# Altium PCB Three_Phase_Rectifier_Regulator.PcbDoc
Units mil, origin at the board's own origin, x right, y up, seen from the top; angles counter-clockwise.
Board outline 3937.01 x 3937.01 mil, 2 copper layers (Top Layer, Bottom Layer); 16 components, 9 nets, 757 pads, 0 vias.
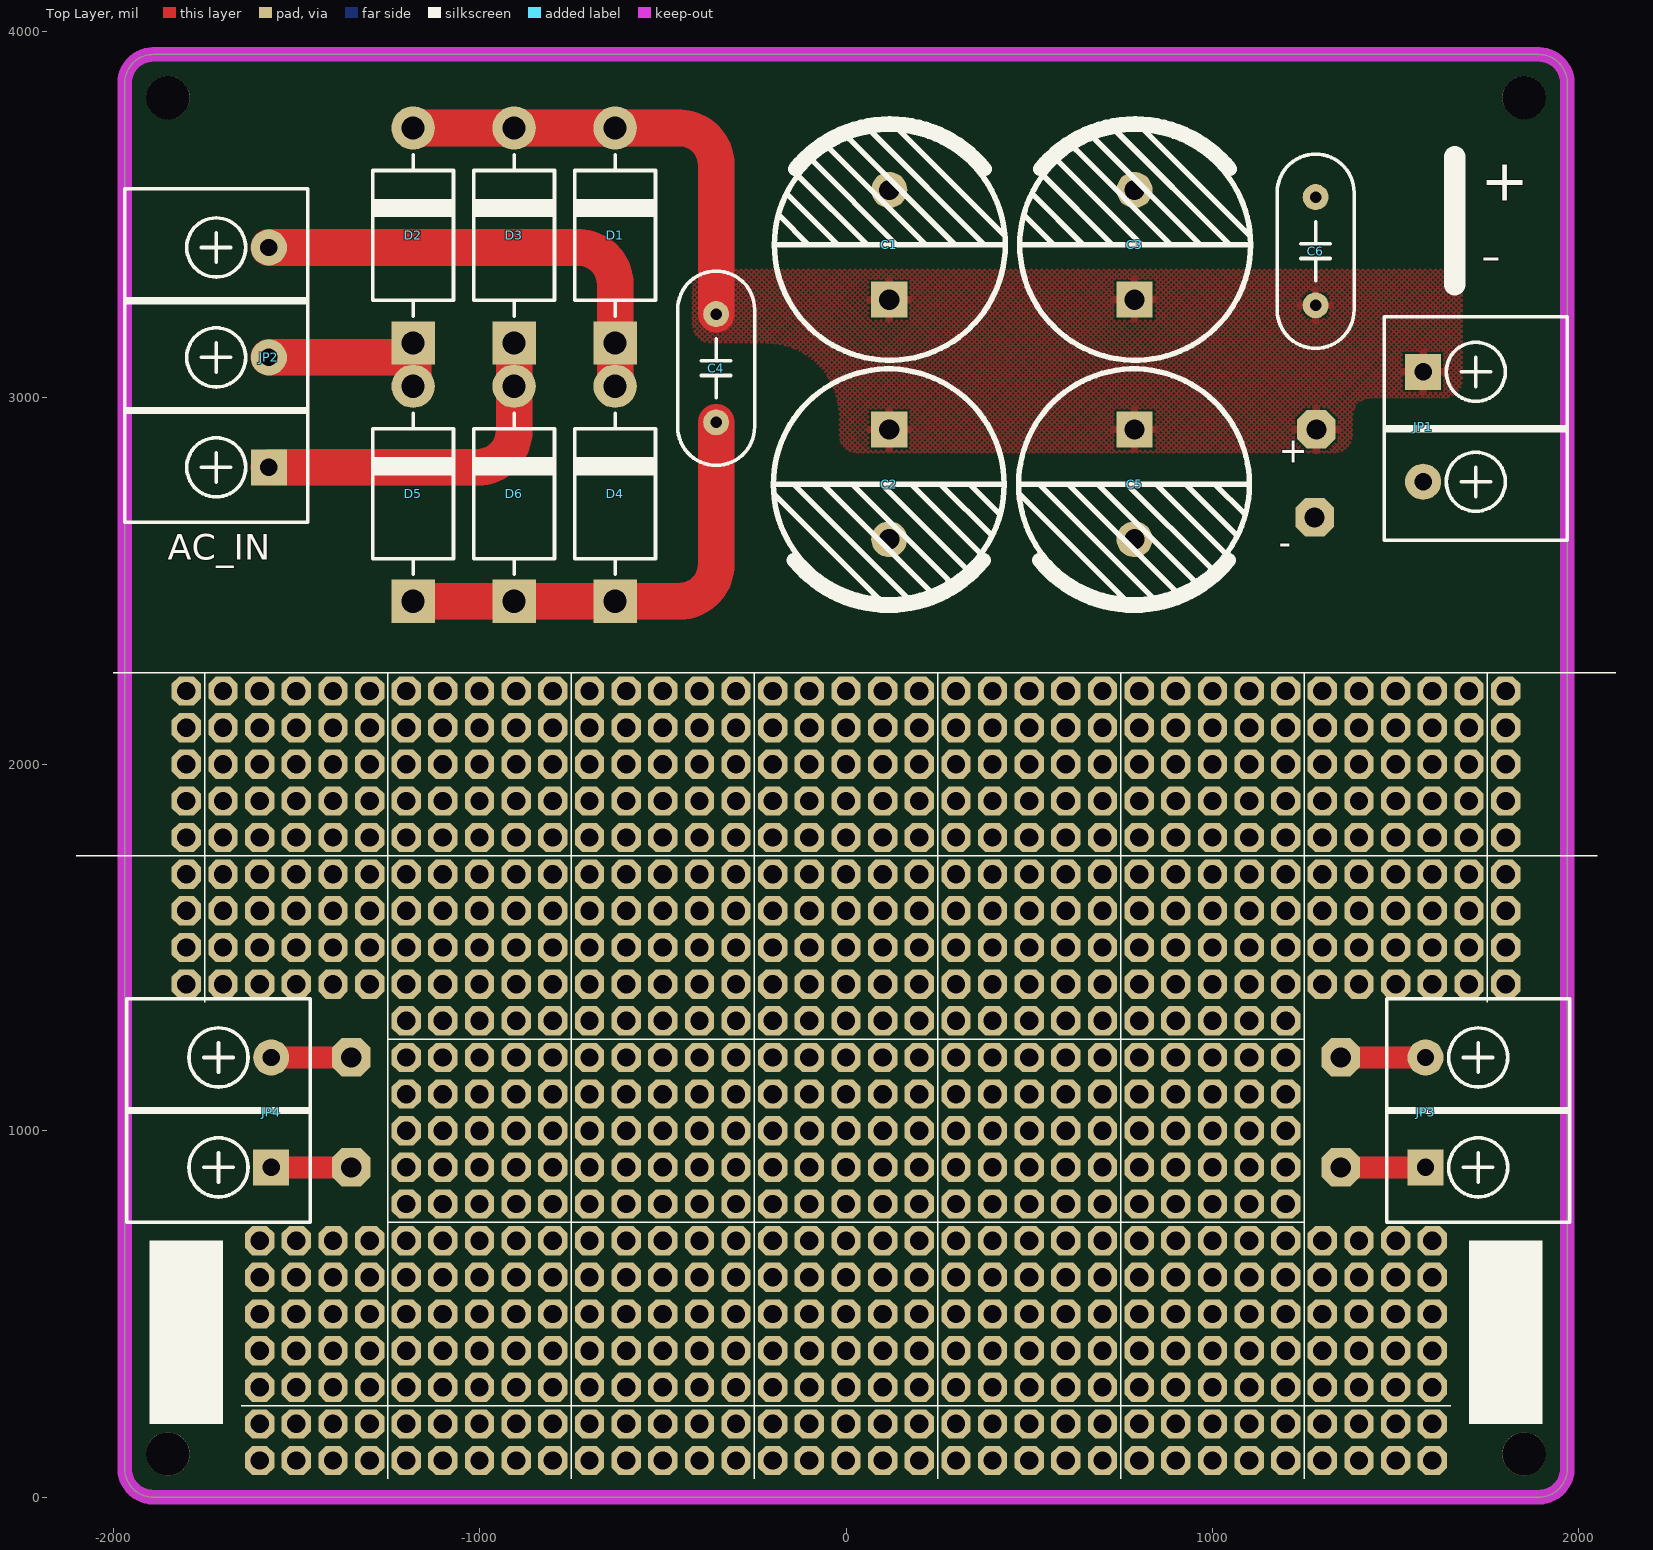
[diagram p0: Top Layer view]
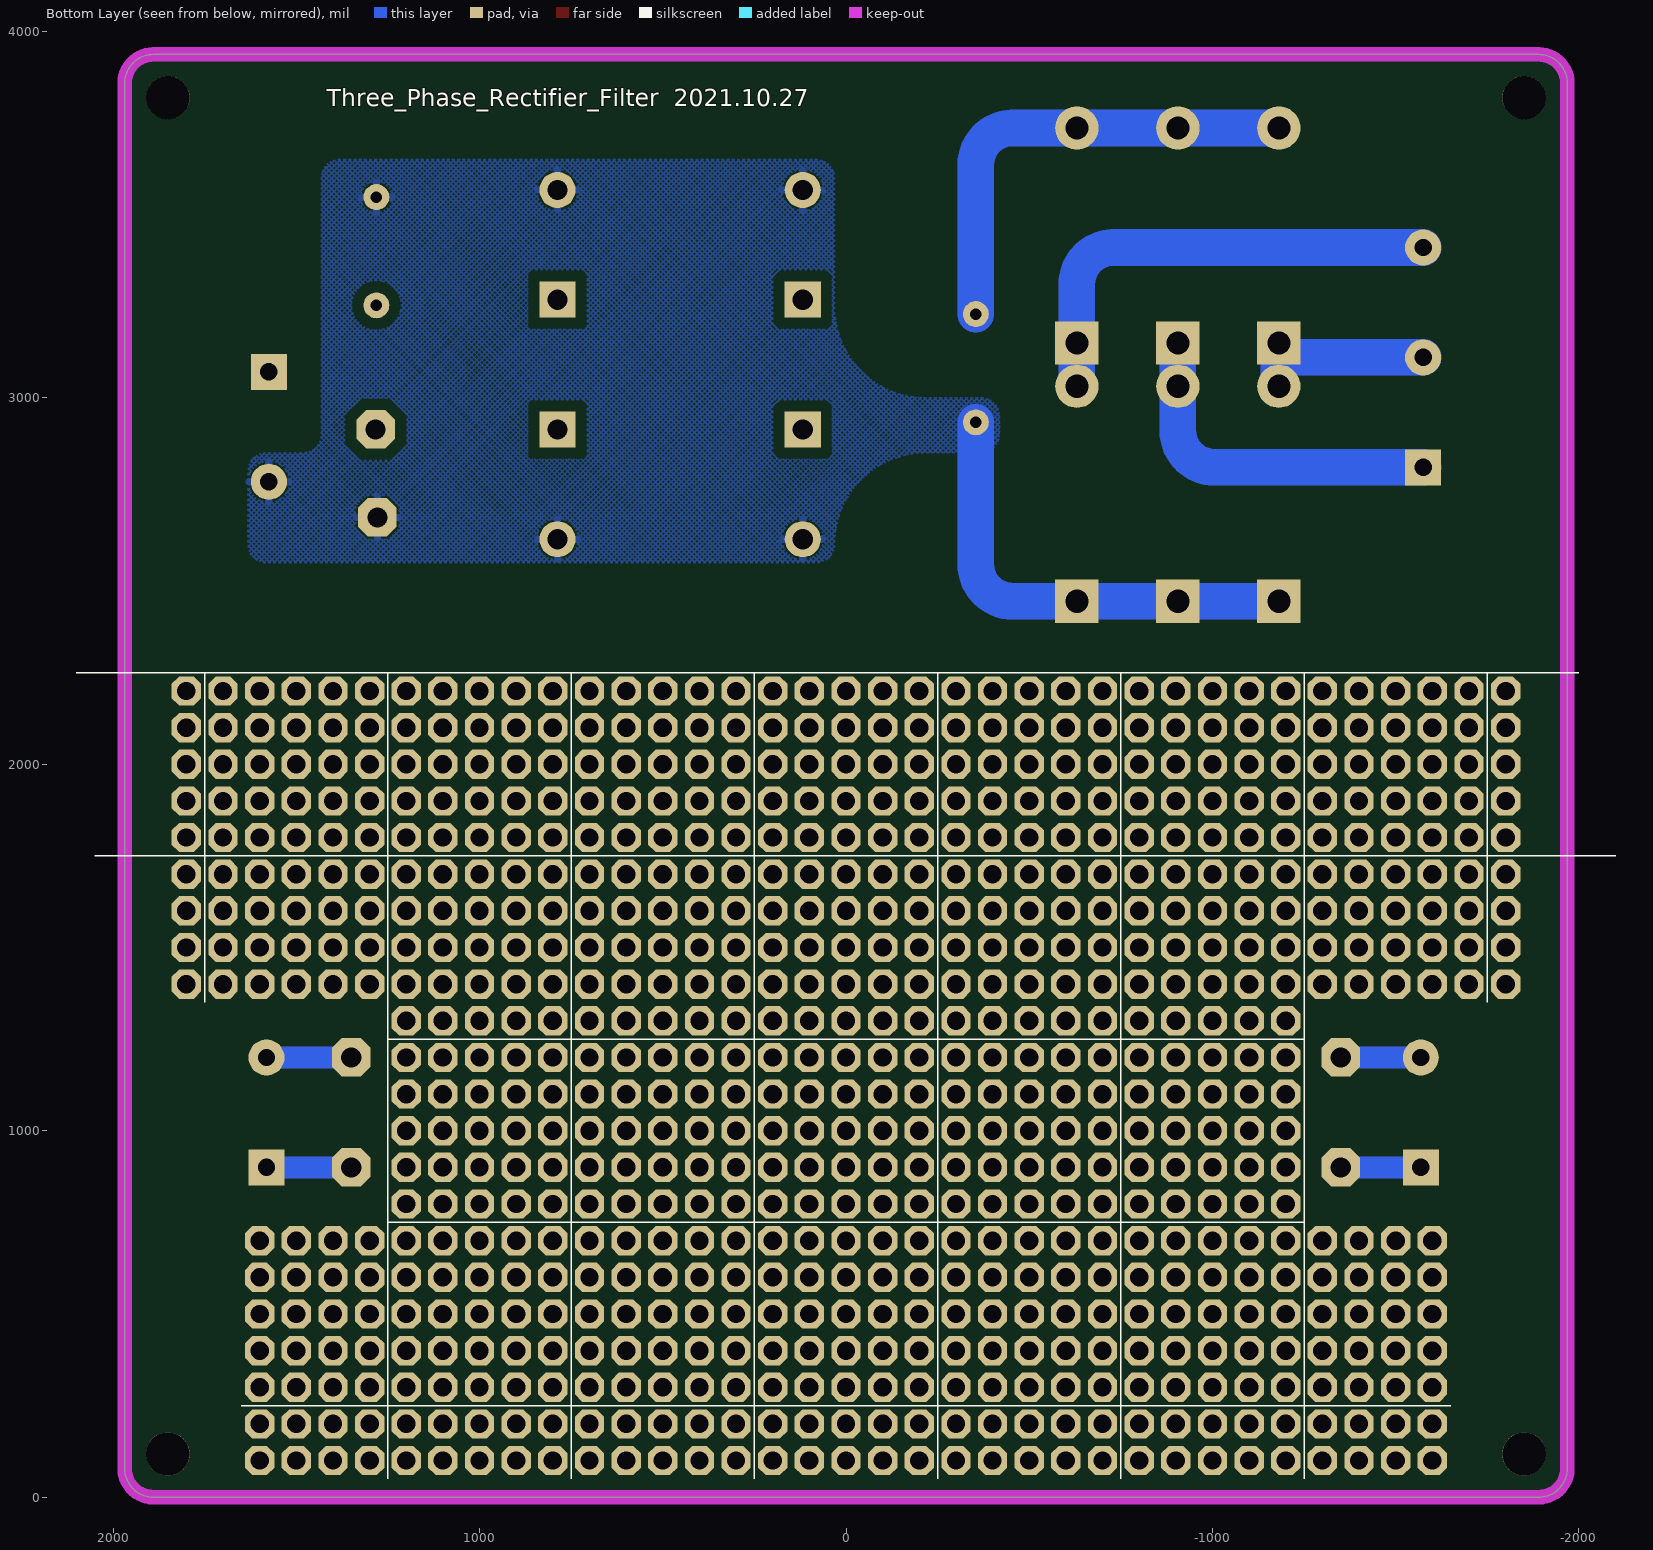
[diagram p1: Bottom Layer view, seen from below]

## Layer stack, top to bottom
Top Solder: solder mask 0.4, Solder Resist, Dk 3.5
Top Layer: signal copper 1.4
Dielectric 1: dielectric 12.6, FR-4, Dk 4.8
Bottom Layer: signal copper 1.4
Bottom Solder: solder mask 0.4, Solder Resist, Dk 3.5

## Board outline
-1968.5,78.74 -1968.5,3858.27 cw(c-1889.76,3858.27) -1889.76,3937.01 1889.76,3937.01 cw(c1889.76,3858.27) 1968.5,3858.27 1968.5,78.74 cw(c1889.76,78.74) 1889.76,0 -1889.76,0 cw(c-1889.76,78.74)

## Design rules (kind name [scope] priority, off if disabled: settings)
Clearance [All] p1: gap=30 ignorepadtopadclearanceinfootprint=FALSE except(0: Arc-Hole Track-Hole SMDPad-Hole THPad-Hole Via-Hole Fill-Hole Poly-Hole Region-Hole Text-Hole; 10: Arc-Arc Arc-Track Arc-SMDPad Arc-THPad Arc-Via Arc-Text Track-Track Track-SMDPad Track-THPad Track-Via Track-Text SMDPad-SMDPad SMDPad-THPad SMDPad-Via SMDPad-Text THPad-THPad THPad-Via THPad-Text Via-Via Via-Text Text-Text)
HoleSize [All] p1 off: absolutevalues=TRUE maxlimit=100 minlimit=1 maxpercent=80.000 minpercent=20.000
MinimumSolderMaskSliver [All] p1 off: minsoldermaskwidth=10
PolygonConnect [All] p1: thpad.connectstyle=Relief thpad.reliefconductorwidth=20 thpad.reliefentries=4 thpad.polygonreliefangle="90 Angle" thpad.airgapwidth=5 smdpad.connectstyle=Relief smdpad.reliefconductorwidth=10 smdpad.reliefentries=4 smdpad.polygonreliefangle="90 Angle" smdpad.airgapwidth=10 via.connectstyle=Relief via.reliefconductorwidth=10 via.reliefentries=4 via.polygonreliefangle="90 Angle" via.airgapwidth=10
RoutingVias [All] p1: holewidth=28 width=50 viastyle="Through Hole" minholewidth=28 minwidth=50 maxholewidth=28 maxwidth=50
SilkToSilkClearance [All] p1 off: silktosilkclearance=10
SilkToSolderMaskClearance [IsPad] p1 off: minsilkscreentomaskgap=10 clearancetoexposedcopper=TRUE
SolderMaskExpansion [All] p1: expansion=4 istentingtop=FALSE
Width [All] p1: maxlimit=100 minlimit=10 preferedwidth=10
26 further rules are at their usual default settings.

## Components (designator, comment, footprint, x,y, rotation, side; value= is the part's Value field where it differs from the comment)
C1 "400uF" "CAP 7.5*16*25 - GD" 119.61,3417.32 r90 top
C2 "400uF" "CAP 7.5*16*25 - GD" 116.61,2763.78 r270 top
C3 "400uF" "CAP 7.5*16*25 - GD" 788.9,3417.32 r90 top
C4 "47nF/1KV" "CY 7.5*12*5" -354.33,3080.71 r90 top
C5 "400uF" "CAP 7.5*16*25 - GD" 785.9,2763.78 r270 top
C6 "47nF/1KV" "CY 7.5*12*5" 1281.5,3400 r270 top
D1 "SR540" DO-27 -629.92,3442.91 r90 top
D2 "SR540" DO-27 -1181.1,3442.91 r90 top
D3 "SR540" DO-27 -905.51,3442.91 r90 top
D4 "SR540" DO-27 -629.92,2738.19 r90 top
D5 "SR540" DO-27 -1181.1,2738.19 r90 top
D6 "SR540" DO-27 -905.51,2738.19 r90 top
JP1 "HDR-1X2" KF7620-2P#1 1718.5,2920.87 r270 top
JP2 "HDR-1X3" KF7620-3P -1718.5,3110.24 r90 top
JP3 "HDR-1X2" KF7620-2P#2 1725.2,1050 r90 top
JP4 "HDR-1X2" KF7620-2P#1 -1712.2,1050 r90 top

## Footprints (in the part's own frame and the unit in brackets; to place one, negate y for a bottom-side part, rotate by r counter-clockwise, add the part's x,y. Pads: shape width x height; smd on the part's side, far side on the other; paste and mask are expansions set on the pad)
"CAP 7.5*16*25 - GD" [mm] "脚距7.5mm直径16mm高度25mmhttps://item.taobao.com/item.htm?ft=t&id=613637044352"
  rect 2.5x2.5 hole 1.4: 1(-3.8,0.038)
  round 2.5 hole 1.4: 2(3.8,0.038)
  silkscreen extent -8,-8 8.42,8, body extent -8,-8 8.01,8, height 25.04
"CY 7.5*12*5" [mm] "脚距7.5mm，直径12mm，厚5mmhttps://item.taobao.com/item.htm?ft=t&id=613637044352"
  round 1.8 hole 0.8: 1(-3.75,0) 2(3.75,0)
  silkscreen extent -6.73,-2.67 6.73,2.67, body extent -6,-2.5 6,2.5, height 12.2
DO-27 [mm] "5.2*14.9mm(直径，脚距）淘宝ID:小糖豆的小窝窝"
  rect 3x3 hole 1.6: 1(-7.45,0)
  round 3 hole 1.6: 2(7.45,0)
  silkscreen extent -5.59,-2.79 5.59,2.79, body extent -8.1,-2.6 8.1,2.6, height 5.25
KF7620-2P#1 [mm] "15.2*12*12mm(长宽高)"
  rect 2.5x2.5 hole 1.2: 1(-3.81,-3.65)
  round 2.5 hole 1.2: 2(3.81,-3.65)
  silkscreen extent -7.62,-6.35 7.87,6.35, body extent -7.62,-6.2 8.32,6.2, height 12.45
KF7620-2P#2 [mm] "15.2*12*12mm(长宽高)"
  rect 2.5x2.5 hole 1.2: 1(-3.81,3.65)
  round 2.5 hole 1.2: 2(3.81,3.65)
  silkscreen extent -7.62,-6.35 7.87,6.35, body extent -7.62,-6.2 8.32,6.2, height 12.45
KF7620-3P [mm] "22.8*12*12mm(长宽高)"
  rect 2.5x2.5 hole 1.2: 1(-7.62,-3.65)
  round 2.5 hole 1.2: 2(0,-3.65) 3(7.62,-3.65)
  silkscreen extent -11.43,-6.35 11.68,6.35, body extent -11.43,-6.2 12.13,6.2, height 12.45

## Part data
C1 C2 C3 C5: library part CE, "直插电解电容", BOM名称=直插电解电容, 下单链接=https://item.taobao.com/item.htm?ft=t&id=613637044352, 淘宝ID=小糖豆的小窝窝
C4 C6: library part CY, "安规Y电容", BOM名称=安规Y电容, 下单链接=https://item.taobao.com/item.htm?ft=t&id=613637044352, 淘宝ID=小糖豆的小窝窝
D1 D2 D3 D4 D5 D6: "肖特基二极管", BOM名称=肖特基二极管, 下单链接=https://item.taobao.com/item.htm?ft=t&id=613637044352
JP1 JP3 JP4: library part "Header 2", "2P接插件", BOM名称=2P接插件, 下单链接=https://item.taobao.com/item.htm?ft=t&id=613637044352, 淘宝ID=小糖豆的小窝窝
JP2: library part "Header 3", "3P接插件", BOM名称=3P接插件, 下单链接=https://item.taobao.com/item.htm?ft=t&id=613637044352, 淘宝ID=小糖豆的小窝窝

## Free pads (board coordinates)
  round 118.11 hole 118.11: Q(-1850.39,118.11) Q(-1850.39,3818.9) Q(1850.39,118.11) Q(1850.39,3818.9)
  oct 80x80 hole 50: Q(-1800,1400) Q(-1800,1500) Q(-1800,1600) Q(-1800,1700) Q(-1800,1800) Q(-1800,1900) Q(-1800,2000) Q(-1800,2100) Q(-1800,2200) Q(-1700,1400) Q(-1700,1500) Q(-1700,1600) Q(-1700,1700) Q(-1700,1800) Q(-1700,1900) Q(-1700,2000) Q(-1700,2100) Q(-1700,2200) Q(-1600,100) Q(-1600,200) Q(-1600,300) Q(-1600,400) Q(-1600,500) Q(-1600,600) Q(-1600,700) Q(-1600,1400) Q(-1600,1500) Q(-1600,1600) Q(-1600,1700) Q(-1600,1800) Q(-1600,1900) Q(-1600,2000) Q(-1600,2100) Q(-1600,2200) Q(-1500,100) Q(-1500,200) Q(-1500,300) Q(-1500,400) Q(-1500,500) Q(-1500,600) Q(-1500,700) Q(-1500,1400) Q(-1500,1500) Q(-1500,1600) Q(-1500,1700) Q(-1500,1800) Q(-1500,1900) Q(-1500,2000) Q(-1500,2100) Q(-1500,2200) Q(-1400,100) Q(-1400,200) Q(-1400,300) Q(-1400,400) Q(-1400,500) Q(-1400,600) Q(-1400,700) Q(-1400,1400) Q(-1400,1500) Q(-1400,1600) Q(-1400,1700) Q(-1400,1800) Q(-1400,1900) Q(-1400,2000) Q(-1400,2100) Q(-1400,2200) Q(-1300,100) Q(-1300,200) Q(-1300,300) Q(-1300,400) Q(-1300,500) Q(-1300,600) Q(-1300,700) Q(-1300,1400) Q(-1300,1500) Q(-1300,1600) Q(-1300,1700) Q(-1300,1800) Q(-1300,1900) Q(-1300,2000) Q(-1300,2100) Q(-1300,2200) Q(-1200,100) Q(-1200,200) Q(-1200,300) Q(-1200,400) Q(-1200,500) Q(-1200,600) Q(-1200,700) Q(-1200,800) Q(-1200,900) Q(-1200,1000) Q(-1200,1100) Q(-1200,1200) Q(-1200,1300) Q(-1200,1400) Q(-1200,1500) Q(-1200,1600) Q(-1200,1700) Q(-1200,1800) Q(-1200,1900) Q(-1200,2000) Q(-1200,2100) Q(-1200,2200) Q(-1100,100) Q(-1100,200) Q(-1100,300) Q(-1100,400) Q(-1100,500) Q(-1100,600) Q(-1100,700) Q(-1100,800) Q(-1100,900) Q(-1100,1000) Q(-1100,1100) Q(-1100,1200) Q(-1100,1300) Q(-1100,1400) Q(-1100,1500) Q(-1100,1600) Q(-1100,1700) Q(-1100,1800) Q(-1100,1900) Q(-1100,2000) Q(-1100,2100) Q(-1100,2200) Q(-1000,100) Q(-1000,200) Q(-1000,300) Q(-1000,400) Q(-1000,500) Q(-1000,600) Q(-1000,700) Q(-1000,800) Q(-1000,900) Q(-1000,1000) Q(-1000,1100) Q(-1000,1200) Q(-1000,1300) Q(-1000,1400) Q(-1000,1500) Q(-1000,1600) Q(-1000,1700) Q(-1000,1800) Q(-1000,1900) Q(-1000,2000) Q(-1000,2100) Q(-1000,2200) Q(-900,100) Q(-900,200) Q(-900,300) Q(-900,400) Q(-900,500) Q(-900,600) Q(-900,700) Q(-900,800) Q(-900,900) Q(-900,1000) Q(-900,1100) Q(-900,1200) Q(-900,1300) Q(-900,1400) Q(-900,1500) Q(-900,1600) Q(-900,1700) Q(-900,1800) Q(-900,1900) Q(-900,2000) Q(-900,2100) Q(-900,2200) Q(-800,100) Q(-800,200) Q(-800,300) Q(-800,400) Q(-800,500) Q(-800,600) Q(-800,700) Q(-800,800) Q(-800,900) Q(-800,1000) Q(-800,1100) Q(-800,1200) Q(-800,1300) Q(-800,1400) Q(-800,1500) Q(-800,1600) Q(-800,1700) Q(-800,1800) Q(-800,1900) Q(-800,2000) Q(-800,2100) Q(-800,2200) Q(-700,100) Q(-700,200) Q(-700,300) Q(-700,400) Q(-700,500) Q(-700,600) Q(-700,700) Q(-700,800) Q(-700,900) Q(-700,1000) Q(-700,1100) Q(-700,1200) Q(-700,1300) Q(-700,1400) Q(-700,1500) Q(-700,1600) Q(-700,1700) Q(-700,1800) Q(-700,1900) Q(-700,2000) Q(-700,2100) Q(-700,2200) Q(-600,100) Q(-600,200) Q(-600,300) Q(-600,400) Q(-600,500) Q(-600,600) Q(-600,700) Q(-600,800) Q(-600,900) Q(-600,1000) Q(-600,1100) Q(-600,1200) Q(-600,1300) Q(-600,1400) Q(-600,1500) Q(-600,1600) Q(-600,1700) Q(-600,1800) Q(-600,1900) Q(-600,2000) Q(-600,2100) Q(-600,2200) Q(-500,100) Q(-500,200) Q(-500,300) Q(-500,400) Q(-500,500) Q(-500,600) Q(-500,700) Q(-500,800) Q(-500,900) Q(-500,1000) Q(-500,1100) Q(-500,1200) Q(-500,1300) Q(-500,1400) Q(-500,1500) Q(-500,1600) Q(-500,1700) Q(-500,1800) Q(-500,1900) Q(-500,2000) Q(-500,2100) Q(-500,2200) Q(-400,100) Q(-400,200) Q(-400,300) Q(-400,400) Q(-400,500) Q(-400,600) Q(-400,700) Q(-400,800) Q(-400,900) Q(-400,1000) Q(-400,1100) Q(-400,1200) Q(-400,1300) Q(-400,1400) Q(-400,1500) Q(-400,1600) Q(-400,1700) Q(-400,1800) Q(-400,1900) Q(-400,2000) Q(-400,2100) Q(-400,2200) Q(-300,100) Q(-300,200) Q(-300,300) Q(-300,400) Q(-300,500) Q(-300,600) Q(-300,700) Q(-300,800) Q(-300,900) Q(-300,1000) Q(-300,1100) Q(-300,1200) Q(-300,1300) Q(-300,1400) Q(-300,1500) Q(-300,1600) Q(-300,1700) Q(-300,1800) Q(-300,1900) Q(-300,2000) Q(-300,2100) Q(-300,2200) Q(-200,100) Q(-200,200) Q(-200,300) Q(-200,400) Q(-200,500) Q(-200,600) Q(-200,700) Q(-200,800) Q(-200,900) Q(-200,1000) Q(-200,1100) Q(-200,1200) Q(-200,1300) Q(-200,1400) Q(-200,1500) Q(-200,1600) Q(-200,1700) Q(-200,1800) Q(-200,1900) Q(-200,2000) Q(-200,2100) Q(-200,2200) Q(-100,100) Q(-100,200) Q(-100,300) Q(-100,400) Q(-100,500) Q(-100,600) Q(-100,700) Q(-100,800) Q(-100,900) Q(-100,1000) Q(-100,1100) Q(-100,1200) Q(-100,1300) Q(-100,1400) Q(-100,1500) Q(-100,1600) Q(-100,1700) Q(-100,1800) Q(-100,1900) Q(-100,2000) Q(-100,2100) Q(-100,2200) Q(0,100) Q(0,200) Q(0,300) Q(0,400) Q(0,500) Q(0,600) Q(0,700) Q(0,800) Q(0,900) Q(0,1000) Q(0,1100) Q(0,1200) Q(0,1300) Q(0,1400) Q(0,1500) Q(0,1600) Q(0,1700) Q(0,1800) Q(0,1900) Q(0,2000) Q(0,2100) Q(0,2200) Q(100,100) Q(100,200) Q(100,300) Q(100,400) Q(100,500) Q(100,600) Q(100,700) Q(100,800) Q(100,900) Q(100,1000) Q(100,1100) Q(100,1200) Q(100,1300) Q(100,1400) Q(100,1500) Q(100,1600) Q(100,1700) Q(100,1800) Q(100,1900) Q(100,2000) Q(100,2100) Q(100,2200) Q(200,100) Q(200,200) Q(200,300) Q(200,400) Q(200,500) Q(200,600) Q(200,700) Q(200,800) Q(200,900) Q(200,1000) Q(200,1100) Q(200,1200) Q(200,1300) Q(200,1400) Q(200,1500) Q(200,1600) Q(200,1700) Q(200,1800) Q(200,1900) Q(200,2000) Q(200,2100) Q(200,2200) Q(300,100) Q(300,200) Q(300,300) Q(300,400) Q(300,500) Q(300,600) Q(300,700) Q(300,800) Q(300,900) Q(300,1000) Q(300,1100) Q(300,1200) Q(300,1300) Q(300,1400) Q(300,1500) Q(300,1600) Q(300,1700) Q(300,1800) Q(300,1900) Q(300,2000) Q(300,2100) Q(300,2200) Q(400,100) Q(400,200) Q(400,300) Q(400,400) Q(400,500) Q(400,600) Q(400,700) Q(400,800) Q(400,900) Q(400,1000) Q(400,1100) Q(400,1200) Q(400,1300) Q(400,1400) Q(400,1500) Q(400,1600) Q(400,1700) Q(400,1800) Q(400,1900) Q(400,2000) Q(400,2100) Q(400,2200) Q(500,100) Q(500,200) Q(500,300) Q(500,400) Q(500,500) Q(500,600) Q(500,700) Q(500,800) Q(500,900) Q(500,1000) Q(500,1100) Q(500,1200) Q(500,1300) Q(500,1400) Q(500,1500) Q(500,1600) Q(500,1700) Q(500,1800) Q(500,1900) Q(500,2000) Q(500,2100) Q(500,2200) Q(600,100) Q(600,200) Q(600,300) Q(600,400) Q(600,500) Q(600,600) Q(600,700) Q(600,800) Q(600,900) Q(600,1000) Q(600,1100) Q(600,1200) Q(600,1300) Q(600,1400) Q(600,1500) Q(600,1600) Q(600,1700) Q(600,1800) Q(600,1900) Q(600,2000) Q(600,2100) Q(600,2200) Q(700,100) Q(700,200) Q(700,300) Q(700,400) Q(700,500) Q(700,600) Q(700,700) Q(700,800) Q(700,900) Q(700,1000) Q(700,1100) Q(700,1200) Q(700,1300) Q(700,1400) Q(700,1500) Q(700,1600) Q(700,1700) Q(700,1800) Q(700,1900) Q(700,2000) Q(700,2100) Q(700,2200) Q(800,100) Q(800,200) Q(800,300) Q(800,400) Q(800,500) Q(800,600) Q(800,700) Q(800,800) Q(800,900) Q(800,1000) Q(800,1100) Q(800,1200) Q(800,1300) Q(800,1400) Q(800,1500) Q(800,1600) Q(800,1700) Q(800,1800) Q(800,1900) Q(800,2000) Q(800,2100) Q(800,2200) Q(900,100) Q(900,200) Q(900,300) Q(900,400) Q(900,500) Q(900,600) Q(900,700) Q(900,800) Q(900,900) Q(900,1000) Q(900,1100) Q(900,1200) Q(900,1300) Q(900,1400) Q(900,1500) Q(900,1600) Q(900,1700) Q(900,1800) Q(900,1900) Q(900,2000) Q(900,2100) Q(900,2200) Q(1000,100) Q(1000,200) Q(1000,300) Q(1000,400) Q(1000,500) Q(1000,600) Q(1000,700) Q(1000,800) Q(1000,900) Q(1000,1000) Q(1000,1100) Q(1000,1200) Q(1000,1300) Q(1000,1400) Q(1000,1500) Q(1000,1600) Q(1000,1700) Q(1000,1800) Q(1000,1900) Q(1000,2000) Q(1000,2100) Q(1000,2200) Q(1100,100) Q(1100,200) Q(1100,300) Q(1100,400) Q(1100,500) Q(1100,600) Q(1100,700) Q(1100,800) Q(1100,900) Q(1100,1000) Q(1100,1100) Q(1100,1200) Q(1100,1300) Q(1100,1400) Q(1100,1500) Q(1100,1600) Q(1100,1700) Q(1100,1800) Q(1100,1900) Q(1100,2000) Q(1100,2100) Q(1100,2200) Q(1200,100) Q(1200,200) Q(1200,300) Q(1200,400) Q(1200,500) Q(1200,600) Q(1200,700) Q(1200,800) Q(1200,900) Q(1200,1000) Q(1200,1100) Q(1200,1200) Q(1200,1300) Q(1200,1400) Q(1200,1500) Q(1200,1600) Q(1200,1700) Q(1200,1800) Q(1200,1900) Q(1200,2000) Q(1200,2100) Q(1200,2200) Q(1300,100) Q(1300,200) Q(1300,300) Q(1300,400) Q(1300,500) Q(1300,600) Q(1300,700) Q(1300,1400) Q(1300,1500) Q(1300,1600) Q(1300,1700) Q(1300,1800) Q(1300,1900) Q(1300,2000) Q(1300,2100) Q(1300,2200) Q(1400,100) Q(1400,200) Q(1400,300) Q(1400,400) Q(1400,500) Q(1400,600) Q(1400,700) Q(1400,1400) Q(1400,1500) Q(1400,1600) Q(1400,1700) Q(1400,1800) Q(1400,1900) Q(1400,2000) Q(1400,2100) Q(1400,2200) Q(1500,100) Q(1500,200) Q(1500,300) Q(1500,400) Q(1500,500) Q(1500,600) Q(1500,700) Q(1500,1400) Q(1500,1500) Q(1500,1600) Q(1500,1700) Q(1500,1800) Q(1500,1900) Q(1500,2000) Q(1500,2100) Q(1500,2200) Q(1600,100) Q(1600,200) Q(1600,300) Q(1600,400) Q(1600,500) Q(1600,600) Q(1600,700) Q(1600,1400) Q(1600,1500) Q(1600,1600) Q(1600,1700) Q(1600,1800) Q(1600,1900) Q(1600,2000) Q(1600,2100) Q(1600,2200) Q(1700,1400) Q(1700,1500) Q(1700,1600) Q(1700,1700) Q(1700,1800) Q(1700,1900) Q(1700,2000) Q(1700,2100) Q(1700,2200) Q(1800,1400) Q(1800,1500) Q(1800,1600) Q(1800,1700) Q(1800,1800) Q(1800,1900) Q(1800,2000) Q(1800,2100) Q(1800,2200)
  oct 105x105 hole 55: Q(-1350,900) Q(-1350,1200) Q(1278.62,2673.44) Q(1283.46,2913.89) Q(1350,900) Q(1350,1200)

## Nets (pads, with @x,y where several pads share a name; then routed paths per layer and width w, separated by ;. In a path a pad name is that pad's centre, name@x,y a point inside that pad or via, vN(x,y) a via of type N, cw(c..) or ccw(c..) an arc to the next point about the centre after c; other vN are vias at no path point)
1: JP4.2 pad.Q@-1350,1200 | length 437
  Top Layer w60: JP4.2 pad.Q@-1350,1200
  Bottom Layer w60: JP4.2 pad.Q@-1350,1200
2: JP4.1 pad.Q@-1350,900 | length 437
  Top Layer w60: JP4.1 pad.Q@-1350,900
  Bottom Layer w60: JP4.1 pad.Q@-1350,900
3: JP3.2 pad.Q@1350,1200 | length 463
  Top Layer w60: pad.Q@1350,1200 JP3.2
  Bottom Layer w60: pad.Q@1350,1200 JP3.2
4: JP3.1 pad.Q@1350,900 | length 463
  Top Layer w60: pad.Q@1350,900 JP3.1
  Bottom Layer w60: pad.Q@1350,900 JP3.1
NetC1_1: C1.1 C2.1 C3.1 C4.2 C5.1 C6.2 D1.2 D2.2 D3.2 JP1.1 pad.Q@1283.46,2913.89 | length 2583.5
  Top Layer w100: D2.2 D3.2 D1.2 -454.33,3736.22 cw(c-454.33,3636.22) -354.33,3636.22 C4.2
  Bottom Layer w100: D2.2 D3.2 D1.2 -454.33,3736.22 cw(c-454.33,3636.22) -354.33,3636.22 C4.2
NetC1_2: C1.2 C2.2 C3.2 C4.1 C5.2 C6.1 D4.1 D5.1 D6.1 JP1.2 pad.Q@1278.62,2673.44 | length 2544.1
  Top Layer w100: D5.1 D6.1 D4.1 -454.33,2444.88 ccw(c-454.33,2544.88) -354.33,2544.88 C4.1
  Bottom Layer w100: D5.1 D6.1 D4.1 -454.33,2444.88 ccw(c-454.33,2544.88) -354.33,2544.88 C4.1
NetD1_1: D1.1 D4.2 JP2.3 | length 2561.4
  Top Layer w100: JP2.3 -729.92,3410.24 cw(c-729.92,3310.24) -629.92,3310.24 D1.1 D4.2
  Bottom Layer w100: JP2.3 -729.92,3410.24 cw(c-729.92,3310.24) -629.92,3310.24 D1.1 D4.2
NetD2_1: D2.1 D5.2 JP2.2 | length 1068.6
  Top Layer w100: JP2.2 -1220.47,3110.24 ccw(c-1220.47,3149.61) D2.1 D5.2
  Bottom Layer w100: JP2.2 -1220.47,3110.24 ccw(c-1220.47,3149.61) D2.1 D5.2
NetD3_1: D3.1 D6.2 JP2.1 | length 1931.5
  Top Layer w100: JP2.1 -1005.51,2810.24 ccw(c-1005.51,2910.24) -905.51,2910.24 D6.2 D3.1
  Bottom Layer w100: JP2.1 -1005.51,2810.24 ccw(c-1005.51,2910.24) -905.51,2910.24 D6.2 D3.1

## Polygon pours and split planes (outlines as drawn)
NetC1_1 on Top Layer "NONET_L02_P-001" (hatched 45Degree grid 10 track 5, remove dead copper, pour order 0): -368.5,3350 ccw(c-368.5,3300) -418.5,3300 -418.5,3200 ccw(c-368.5,3200) -368.5,3150 -218.5,3150 cw(c-218.5,2950) -18.5,2950 -18.5,2900 ccw(c31.5,2900) 31.5,2850 1331.5,2850 ccw(c1331.5,2900) 1381.5,2900 1381.5,2950 cw(c1431.5,2950) 1431.5,3000 1631.5,3000 ccw(c1631.5,3050) 1681.5,3050 1681.5,3300 ccw(c1631.5,3300) 1631.5,3350
NetC1_2 on Bottom Layer "NONET_L02_P-001" (hatched 45Degree grid 10 track 5, remove dead copper, pour order 3): -368.5,3000 ccw(c-368.5,2950) -418.5,2950 -418.5,2900 ccw(c-368.5,2900) -368.5,2850 -218.5,2850 cw(c-218.5,2600) 31.5,2600 ccw(c81.5,2600) 81.5,2550 1581.5,2550 ccw(c1581.5,2600) 1631.5,2600 1631.5,2800 ccw(c1581.5,2800) 1581.5,2850 1481.5,2850 cw(c1481.49,2900) 1431.5,2900 1431.5,3600 ccw(c1381.5,3600) 1381.5,3650 81.5,3650 ccw(c81.49,3600) 31.5,3600 31.5,3250 cw(c-218.49,3249.99) -218.5,3000

## Keep-outs
Keep-Out Layer:
  lines w40: 1968.5,3858.27 ccw(c1889.76,3858.27) 1889.76,3937.01 -1889.76,3937.01 ccw(c-1889.76,3858.27) -1968.5,3858.27 -1968.5,78.74 ccw(c-1889.76,78.74) -1889.76,0 1889.76,0 ccw(c1889.76,78.74) 1968.5,78.74 1968.5,3858.27 ; 1968.5,3858.27 1968.5,3858.27

## Silkscreen, mask and mechanical layers (free items; w line width, h text height)
Top Overlay:
  rectangle: 1700,200 1900,700
  rectangle: -1900,200 -1700,700
  lines w4: -2100,1750 2050,1750 ; -2000,2250 2100,2250 ; -1750,1350 -1750,2250 ; -1650,250 1650,250 ; -1250,50 -1250,2250 ; -1250,750 1250,750 ; -1250,1250 1250,1250 ; -750,50 -750,2250 ; -250,50 -250,2250 ; 250,50 250,2250 ; 750,50 750,2250 ; 1250,50 1250,2250 ; 1750,1350 1750,2250
  lines w59.06: 1660.76,3308.16 1660.76,3658.16
  text "+" at 1731.5,3500 h196.85
  text "-" at 1731.5,3300 h196.85
  text "+" at 1181.5,2800 h120
  text "-" at 1181.5,2550 h120
  text "AC_IN" at -1851.21,2535 h120
Bottom Overlay:
  lines w4: -2100,1750 2050,1750 ; -2000,2250 2100,2250 ; -1750,1350 -1750,2250 ; -1650,250 1650,250 ; -1250,50 -1250,2250 ; -1250,750 1250,750 ; -1250,1250 1250,1250 ; -750,50 -750,2250 ; -250,50 -250,2250 ; 250,50 250,2250 ; 750,50 750,2250 ; 1250,50 1250,2250 ; 1750,1350 1750,2250
  text "Three_Phase_Rectifier_Filter  2021.10.27" at 1417.32,3779.53 h80
Mechanical 1:
  lines w10: 1973.51,78.74 ccw(c1968.5,78.74) 1973.5,78.82 ; 1973.51,78.74 ccw(c1968.5,78.74) 1973.5,78.82 ; 1973.51,78.74 cw(c1889.76,78.74) 1889.76,-5 -1889.76,-5 cw(c-1889.76,78.74) -1973.5,78.74 -1973.5,3858.27 cw(c-1889.76,3858.27) -1889.76,3942.01 1889.76,3942.01 cw(c1889.76,3858.27) 1973.5,3858.27 1973.5,78.82 ; 1973.5,78.74 1973.5,78.82